# Altium PCB PCB_taycam.PcbDoc
Units mm, origin at the board's own origin, x right, y up, seen from the top; angles counter-clockwise.
Board outline 67.44 x 96.77 mm, 2 copper layers (Top Layer, Bottom Layer); 11 components, 16 nets, 120 pads, 2 vias.
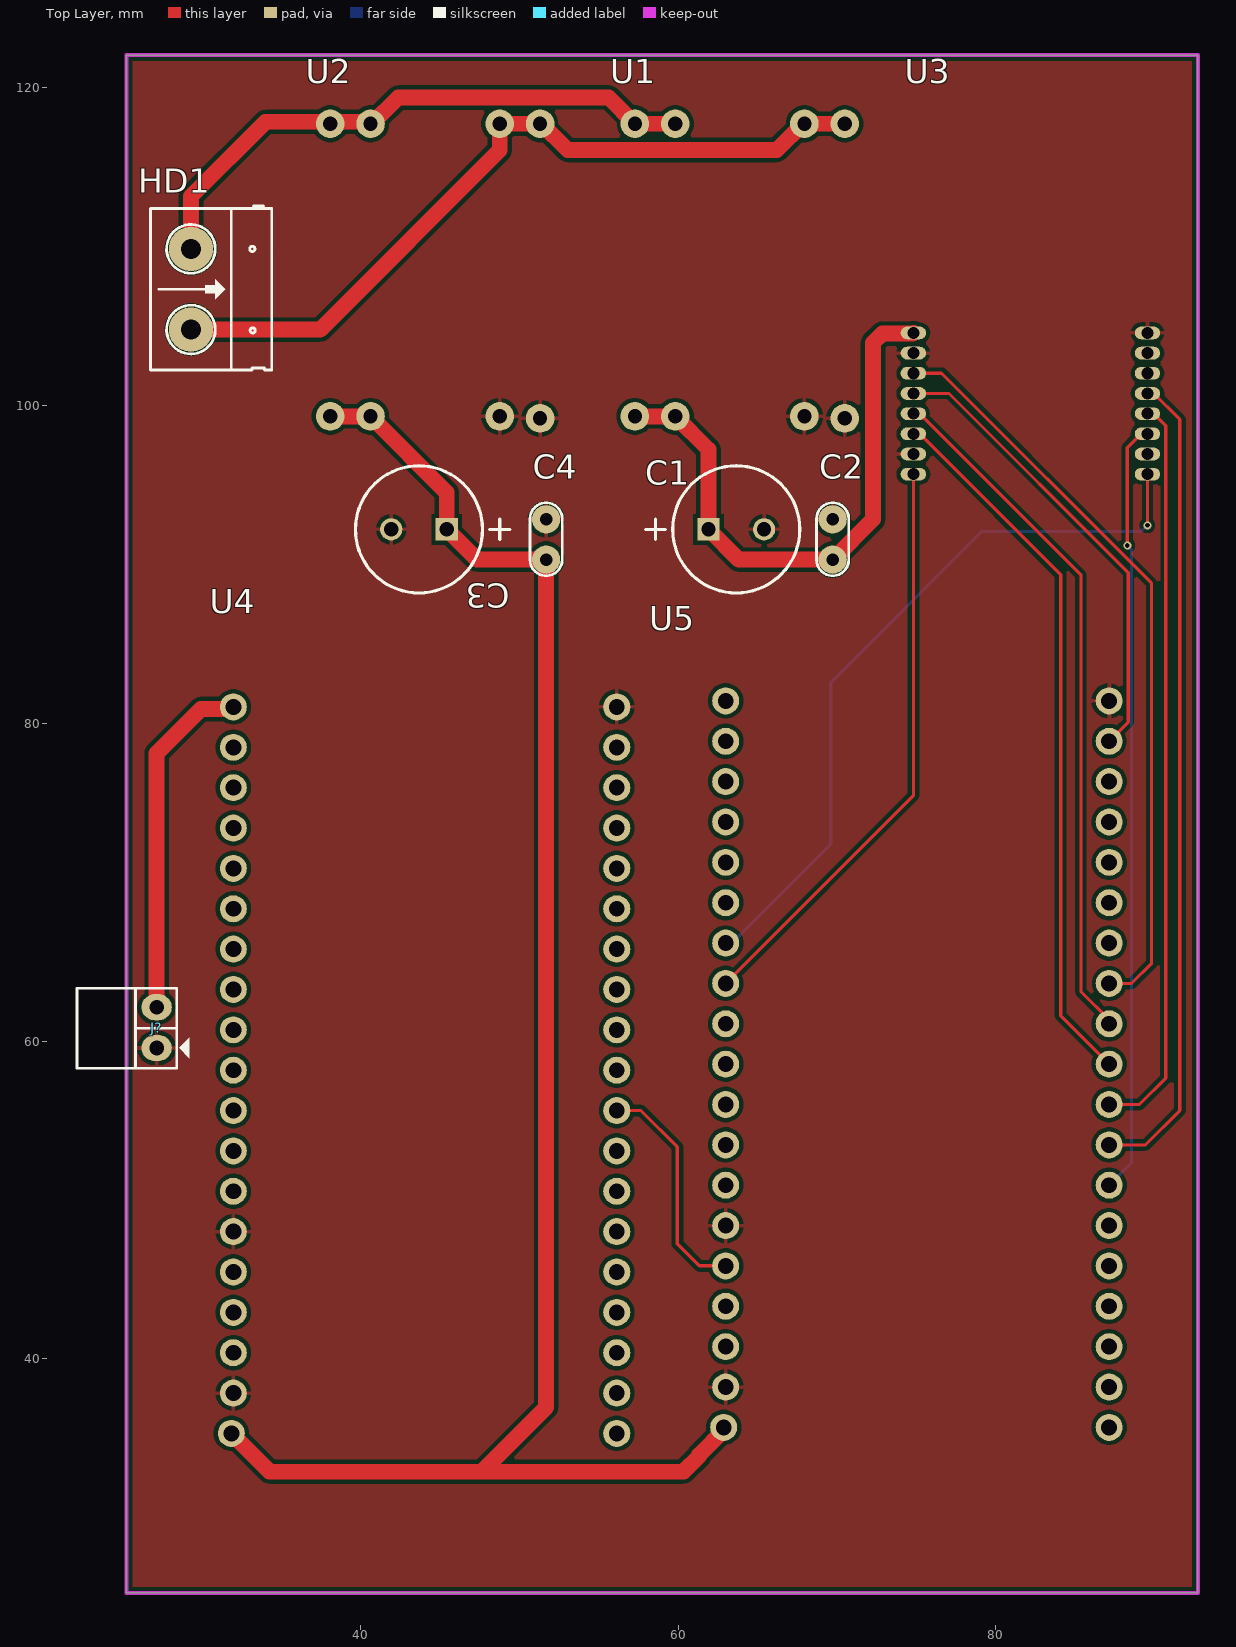
[diagram p0: Top Layer view]
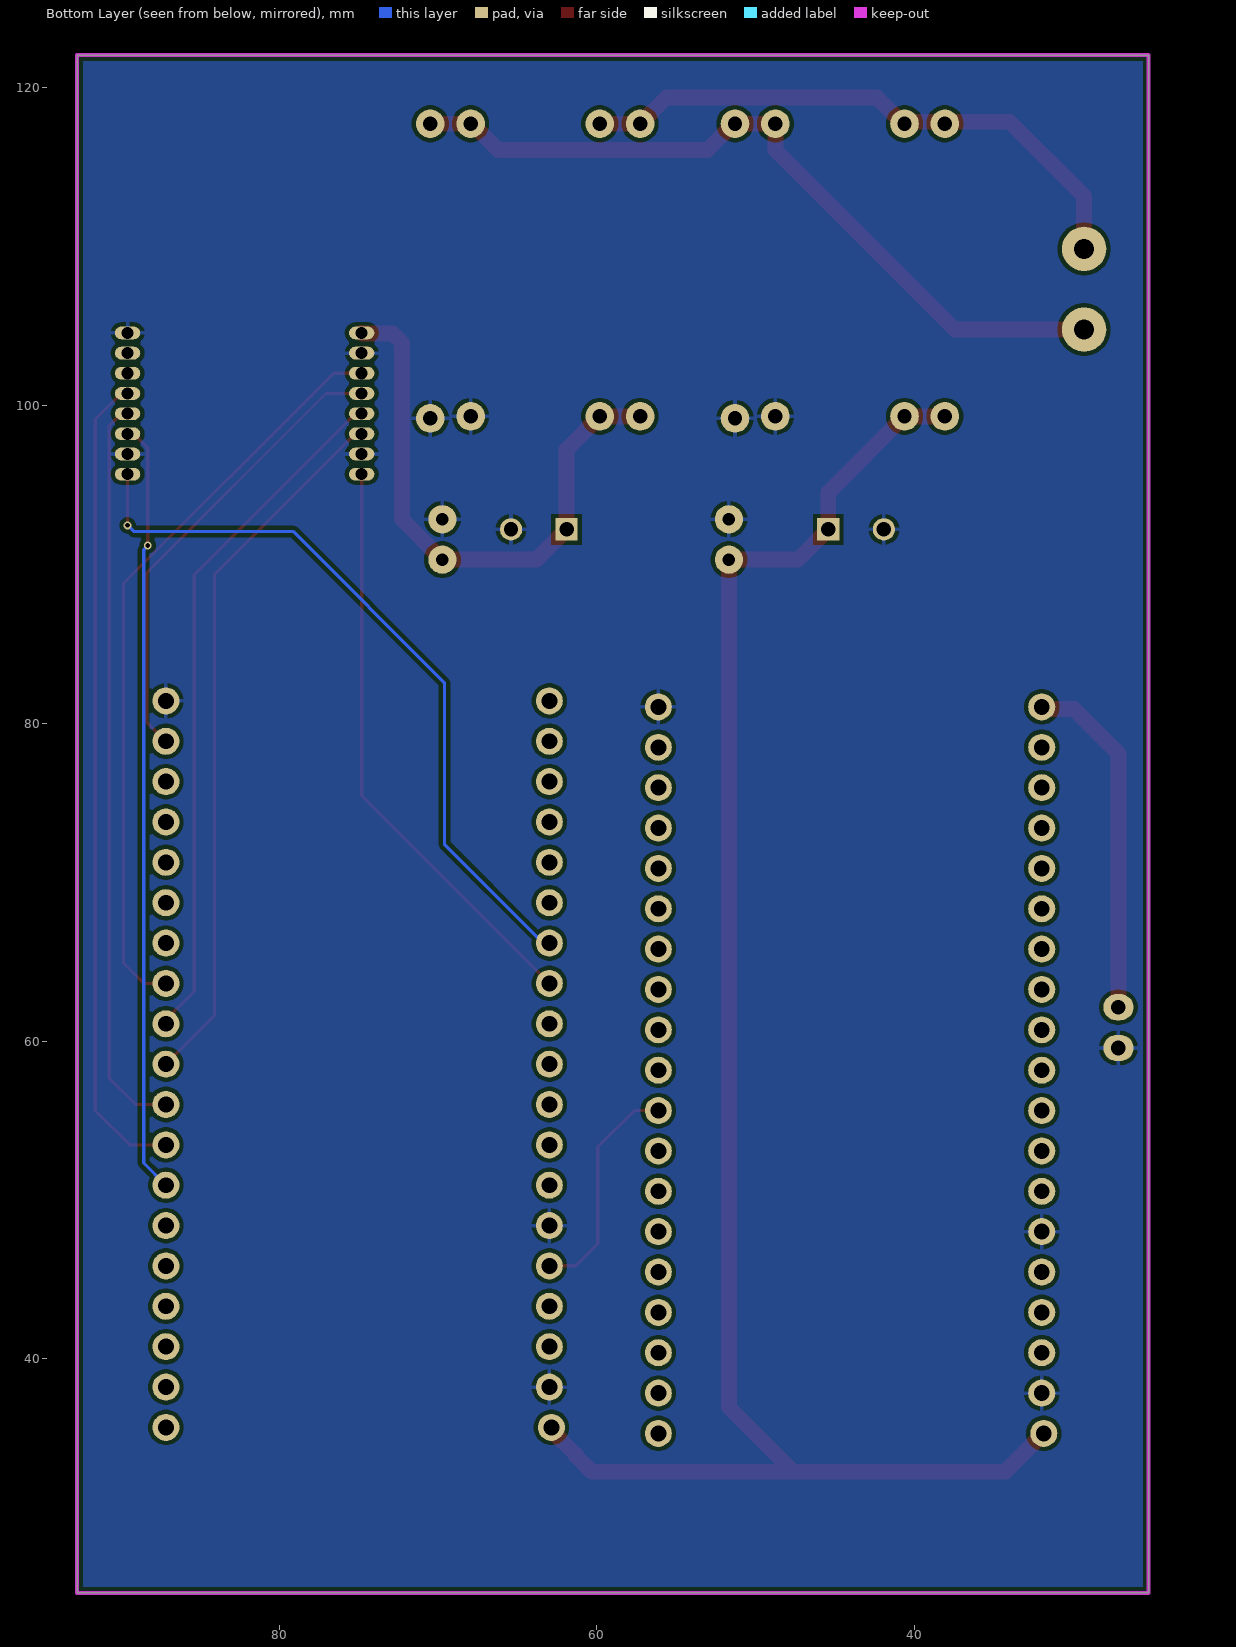
[diagram p1: Bottom Layer view, seen from below]
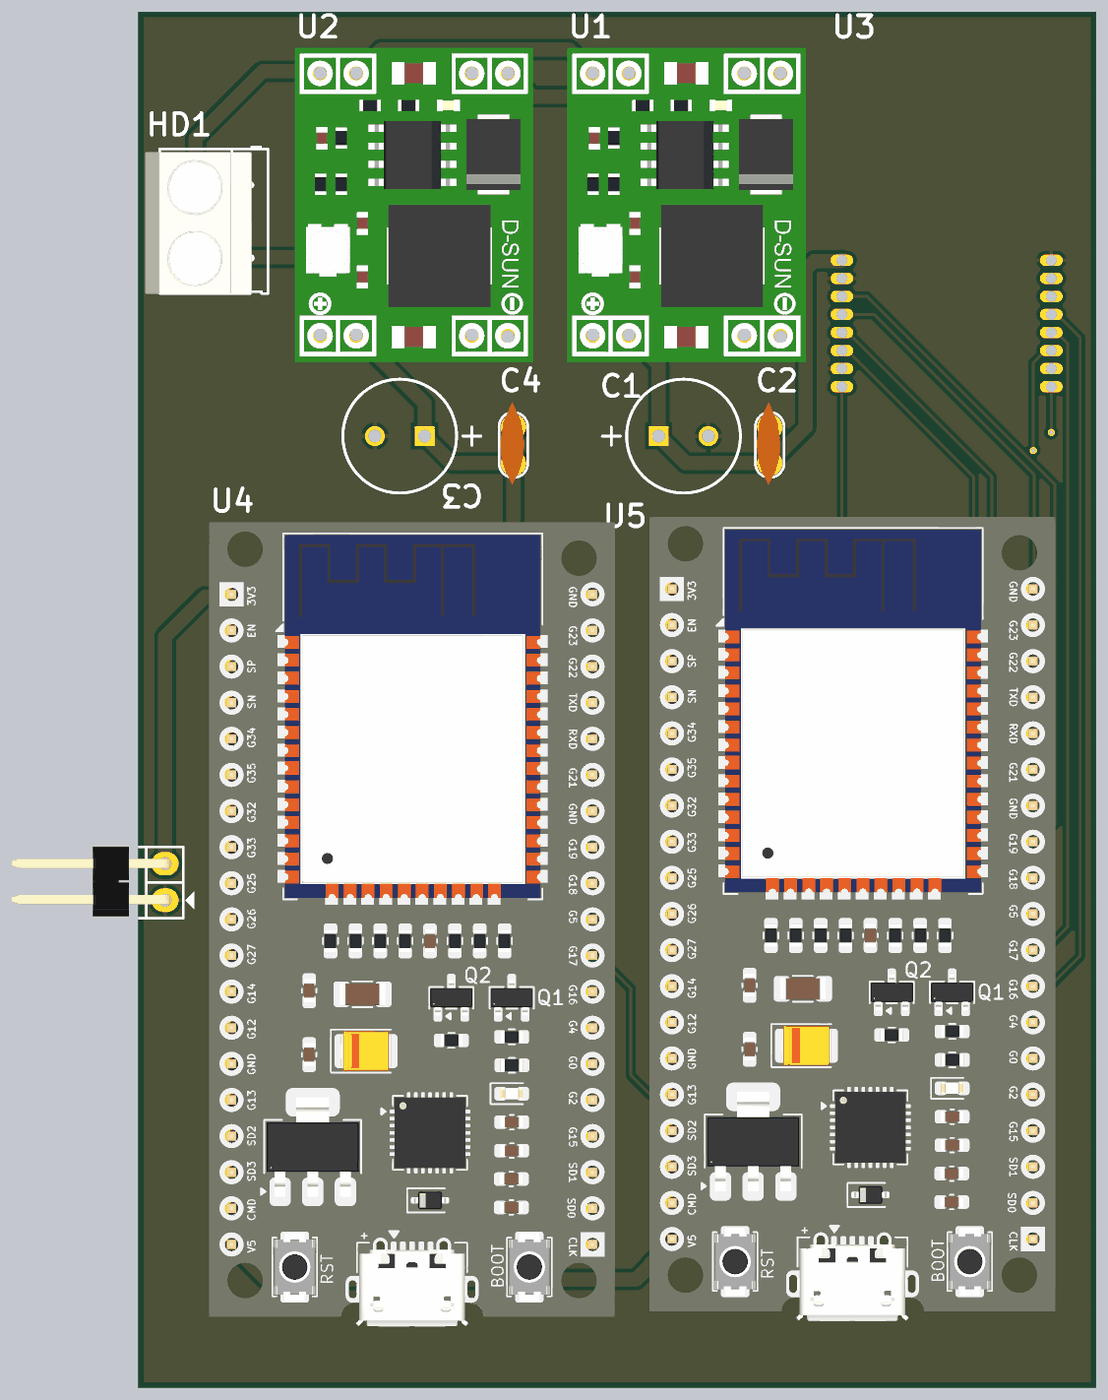
[diagram p2: 3D render of the assembled board from above, using the file's embedded part models]

## Layer stack, top to bottom
Top Solder: solder mask 0.0102, Solder Resist, Dk 3.5
Top Layer: signal copper 0.0356
Dielectric 1: dielectric 0.32, FR-4, Dk 4.8
Bottom Layer: signal copper 0.0356
Bottom Solder: solder mask 0.0102, Solder Resist, Dk 3.5

## Board outline
25.273,25.273 25.273,122.047 92.71,122.047 92.71,25.273

## Design rules (kind name [scope] priority, off if disabled: settings)
Clearance [All] p1: gap=0.254 ignorepadtopadclearanceinfootprint=FALSE
PolygonConnect [All] p1: connectstyle=Relief reliefconductorwidth=0.254 reliefentries=4 polygonreliefangle="90 Angle" airgapwidth=0.254
RoutingVias [All] p1: holewidth=0.3 width=0.5 viastyle="Through Hole" minholewidth=0.3 minwidth=0.5 maxholewidth=0.3 maxwidth=0.5
SolderMaskExpansion [All] p1: expansion=0 istentingtop=FALSE
SupplyNets "Schematic Supply Nets" [InNet('GND')] p1: voltage=0.000
Width [All] p1: maxlimit=1 minlimit=0.2 preferedwidth=0.5
30 further rules are at their usual default settings.

## Components (designator, comment, footprint, x,y, rotation, side; value= is the part's Value field where it differs from the comment)
C1 "ECA1HM101" CAPPR65-350-1150X800X1250 63.655,92.202 r0 top value=100µF
C2 "CAP gom" CN1 69.723,90.297 r90 top
C3 "ECA1HM101" CAPPR65-350-1150X800X1250 43.688,92.202 r180 top value=440µF
C4 "CAP gom" CN1 51.689,90.297 r90 top
HD1 "Header 2" HED2 29.337,109.855 r270 top
J? "Jumper 2" jp2h 27.178,59.563 r90 top value="JP 2"
U1 "MP1584" MP1584 63.881,108.712 r270 top
U2 "MP1584" MP1584 44.704,108.712 r270 top
U3 "ELRS" pcb_tc 74.803,100.755 r0 top
U4 "ESP32" ESP32 32.004,35.306 r0 top
U5 "ESP32" ESP32 62.992,35.687 r0 top

## Footprints (in the part's own frame and the unit in brackets; to place one, negate y for a bottom-side part, rotate by r counter-clockwise, add the part's x,y. Pads: shape width x height; smd on the part's side, far side on the other; paste and mask are expansions set on the pad)
CAPPR65-350-1150X800X1250 [mm] "THD, 2-Leads, Dia 8mm, Pin Spacing 3.5mm"
  rect 1.4x1.4 hole 0.9: 1(-1.75,0)
  round 1.4 hole 0.9: 2(1.75,0)
  silkscreen extent -5.71,-4 4,4, body extent -4,-4 3.95,4, height 12.5
CN1 [mil]
  round 70 hole 31: 1(0,0) 2(100,0)
  silkscreen extent -40,-40 141,40, body extent -60,-30 170,37, height 265
ESP32 [mm]
  round 1.7 hole 1: 1(0,45.72) 2(0,43.18) 3(0,40.64) 4(0,38.1) 5(0,35.56) 6(0,33.02) 7(0,30.48) 8(0,27.94) 9(0,25.4) 10(0,22.86) 11(0,20.32) 12(0,17.78) 13(0,15.24) 14(0,12.7) 15(0,10.16) 16(0,7.62) 17(0,5.08) 18(0,2.54) 19(-0.127,0) 20(24.13,0) 21(24.13,2.54) 22(24.13,5.08) 23(24.13,7.62) 24(24.13,10.16) 25(24.13,12.7) 26(24.13,15.24) 27(24.13,17.78) 28(24.13,20.32) 29(24.13,22.86) 30(24.13,25.4) 31(24.13,27.94) 32(24.13,30.48) 33(24.13,33.02) 34(24.13,35.56) 35(24.13,38.1) 36(24.13,40.64) 37(24.13,43.18) 38(24.13,45.72)
  body extent -1.74,-5.72 26.84,50.85, height 4.69
HED2 [mil] "Header 2, 2 pin, hight 300mil, Pin to Pin 200, Colour Green"
  round 110 hole 50: 1(0,0) 2(200,0)
  silkscreen extent -106,-100 300,200, body extent -92,-140 302,155, height 394
jp2h [mil]
  oval 65x75 hole 36: 1(0,0) 2(101,0)
  silkscreen extent -50,-81 148,197, body extent -44,-14 148,424, height 99
MP1584 [mm]
  round 1.8 hole 0.9: 1(-9.017,4.064) 1(-9.017,6.604) 2(-9.017,-6.604) 2(-9.017,-4.064) 3(9.398,-6.604) 3(9.398,-4.064) 4(9.398,4.064) 4(9.525,6.604)
  body extent -10.8,-8.4 11.3,8.4, height 4.1
pcb_tc [mm]
  oval 1.6x0.8 hole 0.762: 1(0,3.81) 2(0,2.54) 3(0,1.27) 4(0,0) 5(0,-1.27) 6(0,-2.54) 7(0,-3.81) 8(0,-5.08) 9(14.732,-5.08) 10(14.732,-3.81) 11(14.732,-2.54) 12(14.732,-1.27) 13(14.732,0) 14(14.732,1.27) 15(14.732,2.54) 16(14.732,3.81)
  body extent -0.13,-7.75 14.87,18.75, height 2.8

## Part data
C1 C3: library part CMP-001-00026-7, "Aluminum Electrolytic Capacitor, 100 uF, +/- 20%, 50 V, -40 to 85 degC, 2-Pin THD, RoHS, Bulk", Capacitor Type=Electrolytic, Case/Package=Radial, Manufacturer=Panasonic, Max Operating Temperature=85°C, Min Operating Temperature=-40°C, Package Description="2-Pin Radial Lead, Dia 8 mm, Height 12.5 mm", Package Quantity=200, Package Reference=CAPPR65-350-1150X800X1250, Ripple Current=250mA, Tolerance=20%, Voltage Rating=50V, Datasheet URL=https://industrial.panasonic.com/cdbs/www-data/pdf/RDF0000/ABA0000C1218.pdf, Datasheet Version="Rev. 05, 10/2016", Diameter=8mm, Lead Pitch=3.5mm, Manufacturer URL=http://www.panasonic.com/, Mounting Technology=TH, Packaging=Bulk, Pins=2, Ripple Current (AC)=250mA, RoHS Compliant=True
HD1: library part Hed2, "Header 2 (Green)"
J?: library part "JP 2"

## Via types
v1: diameter 0.5, hole 0.3, Top Layer to Bottom Layer, 2 vias

## Nets (pads, with @x,y where several pads share a name; then routed paths per layer and width w, separated by ;. In a path a pad name is that pad's centre, name@x,y a point inside that pad or via, vN(x,y) a via of type N, cw(c..) or ccw(c..) an arc to the next point about the centre after c; other vN are vias at no path point)
GND: C1.2 C2.2 C3.2 C4.2 J?.1 U1.4 U2.4 U3.2 U3.7 U3.10 U3.16 U4.14 U4.18 U4.38 U5.14 U5.18 U5.38
NetC1_1: C1.1 C2.1 U1.3 U3.1 | length 36.8
  Top Layer w1: U1.3@57.277,99.314 U1.3@59.817,99.314 ; U1.3@59.69,99.441 U1.3@59.817,99.314 ; U3.1 74.759,104.521 72.849,104.521 72.263,103.935 72.263,92.837 C2.1 63.81,90.297 C1.1 61.905,97.226 U1.3@59.817,99.314
NetC3_1: C3.1 C4.1 U2.3 U4.19 U5.19 | length 110.9
  Top Layer w1: U4.19 34.29,32.893 60.325,32.893 61.317,33.885 61.317,33.949 62.865,35.498 U5.19 ; U2.3@38.1,99.314 40.64,99.314 45.438,94.516 C3.1 47.343,90.297 C4.1 51.689,36.957 47.752,33.02
NetHD1_1: HD1.1 U1.2 U2.2 | length 37.2
  Top Layer w1: HD1.1 29.337,113.157 34.036,117.856 40.513,117.856 40.64,117.729 40.726,117.729 42.38,119.383 55.623,119.383 57.277,117.729 U1.2@59.817,117.729
NetHD1_2: HD1.2 U1.1 U2.1 | length 48.9
  Top Layer w1: HD1.2 37.465,104.775 48.768,116.078 48.768,117.729 51.308,117.729 51.394,117.729 53.048,116.075 66.205,116.075 67.859,117.729 67.945,117.729 U1.1@70.485,117.729
NetJ?_2: J?.2 U4.1 | length 22
  Top Layer w1: J?.2 27.178,78.105 29.965,80.892 31.87,80.892 U4.1
NetU3_3: U3.3 U5.31 | length 47.6
  Top Layer w0.2: U3.3 76.572,102.025 89.794,88.802 89.794,64.893 88.529,63.627 U5.31
NetU3_4: U3.4 U5.37 | length 29.3
  Top Layer w0.2: U3.4 77.045,100.755 88.326,89.474 88.326,80.071 U5.37
NetU3_5: U3.5 U5.30 | length 43.7
  Top Layer w0.2: U3.5 75.203,99.485 85.344,89.344 85.344,63.119 87.122,61.341 U5.30
NetU3_6: U3.6 U5.29 | length 45
  Top Layer w0.2: U3.6 75.203,98.215 84.074,89.344 84.074,61.595 U5.29
NetU3_8: U3.8 U5.8 | length 36.9
  Top Layer w0.2: U5.8 74.803,75.438 U3.8
NetU3_9: U3.9 U5.7 | length 46.6
  Top Layer w0.2: v1(89.535,92.456) U3.9
  Bottom Layer w0.2: U5.7 63.373,66.167 69.596,72.39 69.596,82.55 79.121,92.075 89.154,92.075 v1(89.535,92.456)
NetU3_11: U3.11 U5.26 | length 48.7
  Top Layer w0.2: v1(88.265,91.186) 88.265,97.345 89.135,98.215 U3.11
  Bottom Layer w0.2: U5.26 88.519,52.324 88.519,90.919 88.265,91.173 v1(88.265,91.186)
NetU3_12: U3.12 U5.28 | length 46.8
  Top Layer w0.2: U5.28 89.027,56.007 90.689,57.669 90.689,98.731 89.935,99.485 U3.12
NetU3_13: U3.13 U5.27 | length 51.5
  Top Layer w0.2: U5.27 89.408,53.467 91.567,55.626 91.567,99.123 89.935,100.755 U3.13
NetU4_28: U4.28 U5.15 | length 14.5
  Top Layer w0.2: U4.28 57.658,55.626 59.944,53.34 59.944,47.244 61.334,45.854 62.985,45.854 U5.15
pads on no net: U3.14 U3.15 U4.2 U4.3 U4.4 U4.5 U4.6 U4.7 U4.8 U4.9 U4.10 U4.11 U4.12 U4.13 U4.15 U4.16 U4.17 U4.20 U4.21 U4.22 U4.23 U4.24 U4.25 U4.26 U4.27 U4.29 U4.30 U4.31 U4.32 U4.33 U4.34 U4.35 U4.36 U4.37 U5.1 U5.2 U5.3 U5.4 U5.5 U5.6 U5.9 U5.10 U5.11 U5.12 U5.13 U5.16 U5.17 U5.20 U5.21 U5.22 U5.23 U5.24 U5.25 U5.32 U5.33 U5.34 U5.35 U5.36

## Polygon pours and split planes (outlines as drawn)
GND on Top Layer "GND_L01_P000" (solid, pour order 0): 25.273,25.273 92.71,25.273 92.71,122.047 25.273,122.047
GND on Bottom Layer "GND_L02_P001" (solid, pour order 1): 25.146,25.273 92.583,25.273 92.583,122.047 25.146,122.047

## Keep-outs
Keep-Out Layer:
  the board outline again, w0.254